# Altium PCB ArmBand-Control-Board.PcbDoc (part 3 of 3)
Units mm, origin at the board's own origin, x right, y up, seen from the top; angles counter-clockwise.
Board outline 45 x 45 mm, 2 copper layers (Top Layer, Bottom Layer), stack 0.864 mm thick; 111 components, 96 nets, 439 pads, 181 vias.
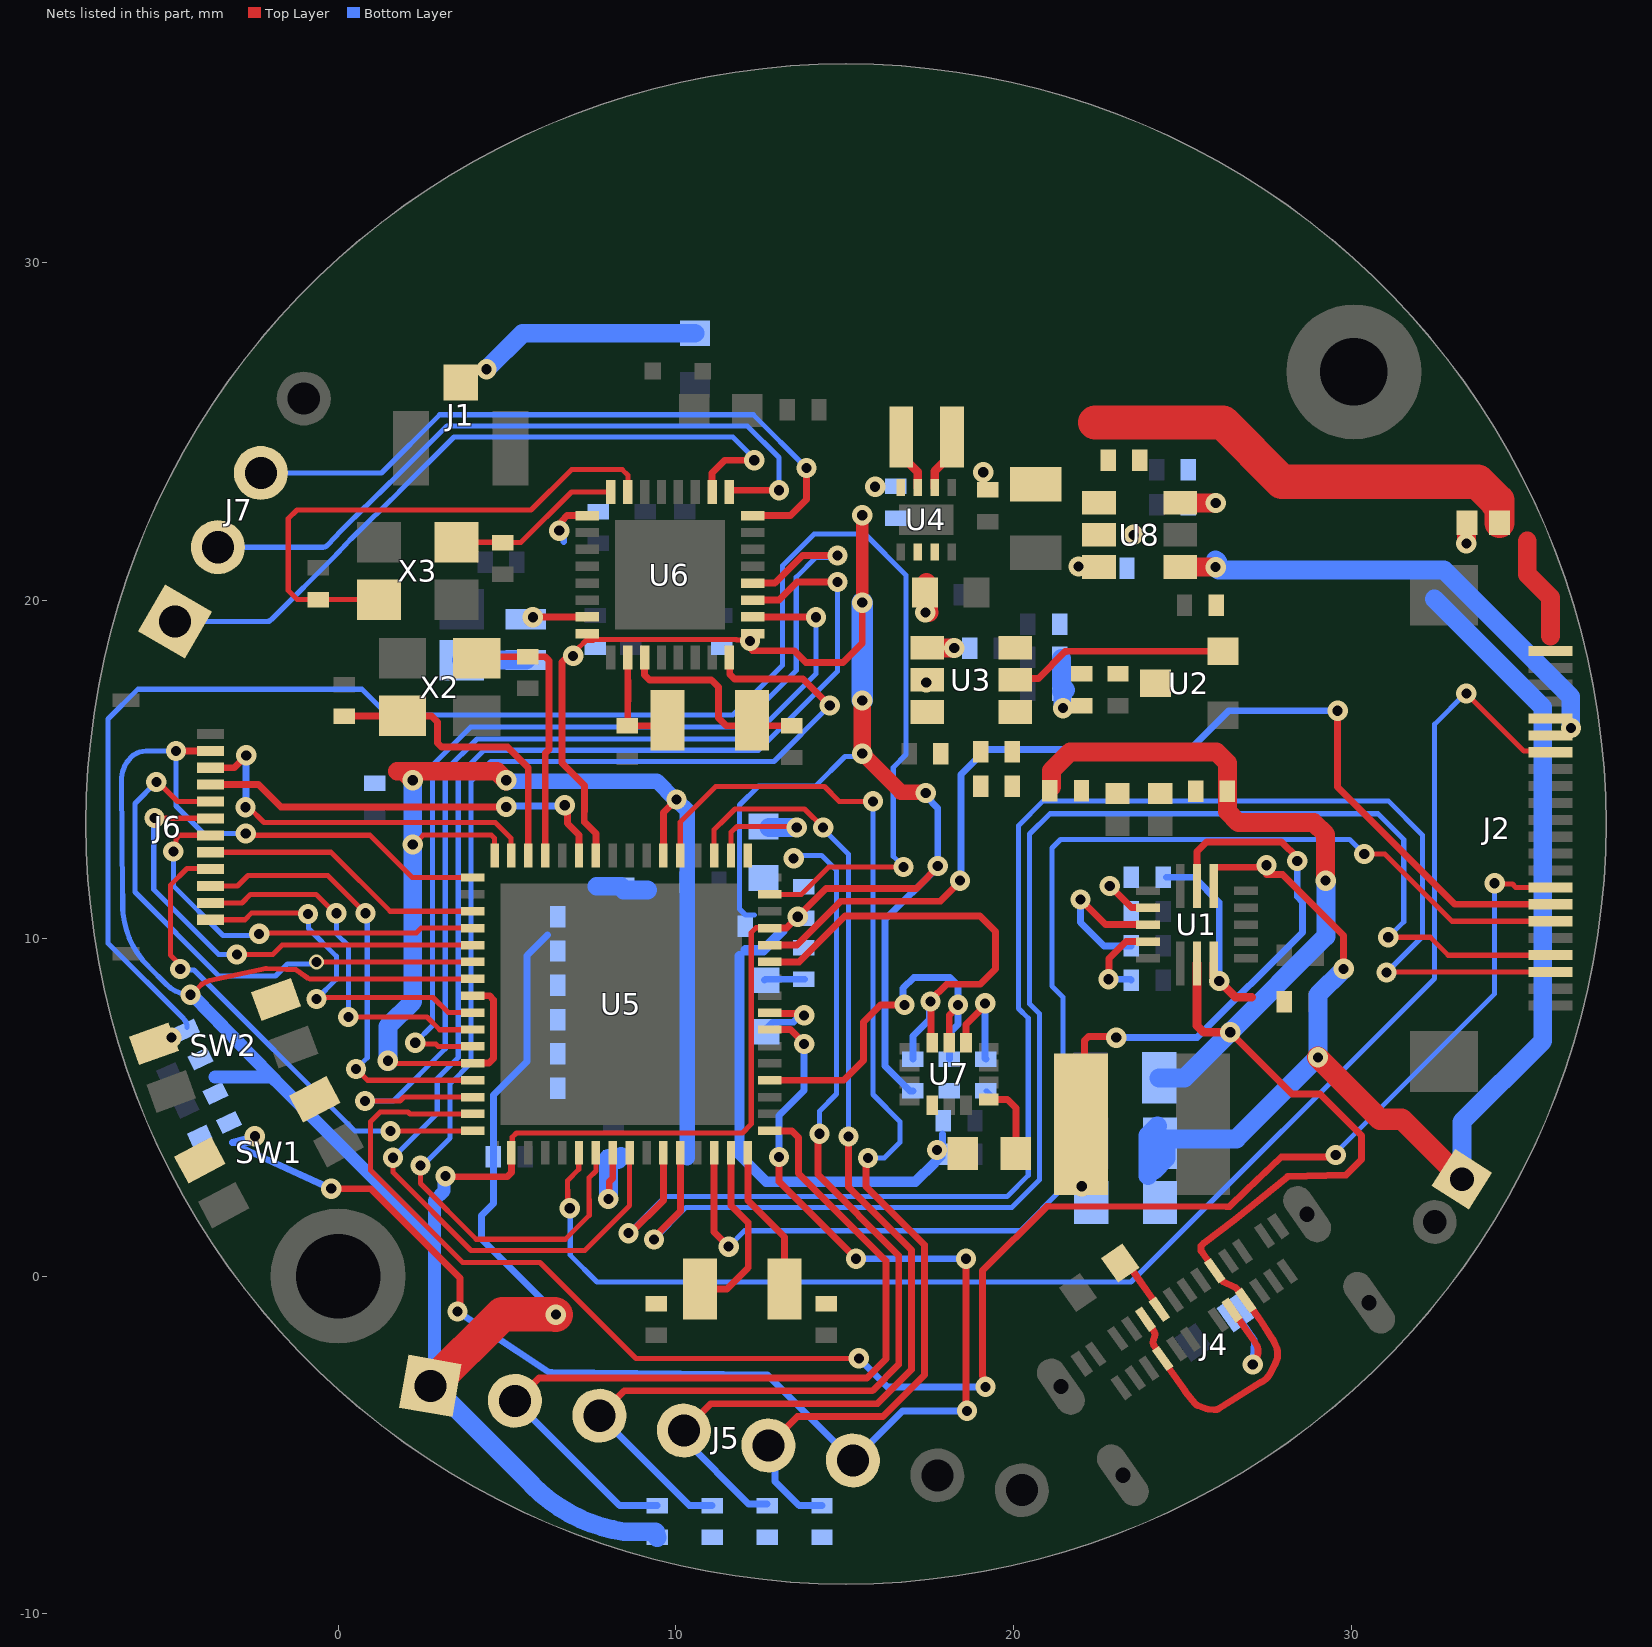
[diagram p2: the nets of this part, all layers, seen from the top]

## Via types
v1: diameter 0.6, hole 0.3, Top Layer to Bottom Layer, tented both sides, 178 vias
v2: diameter 0.45, hole 0.3, Top Layer to Bottom Layer, tented both sides, 2 vias
v3: diameter 0.6, hole 0.3, Top Layer to Bottom Layer, 1 vias

## Nets (pads, with @x,y where several pads share a name; then routed paths per layer and width w, separated by ;. In a path a pad name is that pad's centre, name@x,y a point inside that pad or via, vN(x,y) a via of type N, cw(c..) or ccw(c..) an arc to the next point about the centre after c; other vN are vias at no path point) (continued)
LCD_DB7: J2.7 U5.22 | length 44.9
  Top Layer w0.152: 6.797,2.544 6.797,2.835 7.126,3.164 7.126,3.646 U5.22@7.132,3.652 ; 6.798,2.544 6.798,2.074 v1(6.86,2.012) ; v1(33.401,17.247) 35.105,15.542 35.857,15.542 J2.7@35.89,15.509
  Bottom Layer w0.152: v1(6.86,2.012) 6.872,2 6.872,0.621 7.666,-0.173 23.474,-0.173 32.463,8.816 32.463,16.34 33.369,17.247 v1(33.401,17.247)
LCD_RD: J2.15 U5.15 | length 52.5
  Top Layer w0.152: U5.15@3.982,4.802 2.127,4.802 2.07,4.858 1.248,4.858 0.965,4.576 0.965,3.13 3.688,0.406 5.98,0.406 8.82,-2.434 v1(15.418,-2.434) ; v1(34.239,11.633) 34.266,11.607 34.768,11.607 34.866,11.509 J2.15@35.89,11.509
  Top Layer w0.203: v1(19.167,-3.277) 19.091,-3.201 19.091,-2.975 19.075,-2.959 19.075,0.163 20.982,2.07 21.067,2.07 26.304,2.056 26.389,2.056 26.873,2.54 27.921,3.531 29.476,3.531 v1(29.533,3.588)
  Bottom Layer w0.152: v1@29.533,3.656 34.239,8.362 v1(34.239,11.633)
  Bottom Layer w0.203: v1(15.418,-2.434) 16.261,-3.277 v1(19.167,-3.277) ; v1(29.533,3.588) v1@29.533,3.656
LCD_RS: J2.17 U5.30 | length 39.6
  Top Layer w0.152: v1(30.378,12.497) 30.988,12.497 32.976,10.509 J2.17@35.89,10.509
  Top Layer w0.203: U5.30@11.132,3.652 11.132,1.304 v1(11.563,0.873)
  Bottom Layer w0.152: v1(11.563,0.873) 12.036,1.346 20.193,1.346 21.463,2.616 21.463,8.255 21.133,8.585 21.133,12.675 21.387,12.929 29.947,12.929 v1(30.378,12.497)
LCD_RST: J2.20 U5.27 | length 47.9
  Top Layer w0.152: v1(31.039,8.992) 31.056,9.009 J2.20@35.89,9.009
  Top Layer w0.203: v1(8.595,1.273) 8.664,1.273 9.632,2.241 U5.27@9.632,3.617
  Bottom Layer w0.152: v1(8.595,1.273) 9.685,2.362 19.808,2.362 20.43,2.984 20.43,7.637 20.142,7.925 20.142,13.335 20.879,14.072 31.09,14.072 32.106,13.056 32.106,10.058 v1(31.039,8.992)
LCD_TE: J2.19 U5.28 | length 45.1
  Top Layer w0.152: v1(31.09,10.033) 32.334,10.033 32.868,9.5 35.881,9.5 J2.19@35.89,9.509
  Top Layer w0.203: v1(9.351,1.088) 9.351,1.147 10.132,1.928 U5.28@10.132,3.617
  Bottom Layer w0.152: v1(9.351,1.088) 10.295,2.032 19.945,2.032 20.76,2.848 20.76,7.774 20.472,8.062 20.472,13.086 21.077,13.691 30.785,13.691 31.547,12.929 31.547,10.49 v1(31.09,10.033)
LCD_WRT: J2.16 U5.44 | length 31.5
  Top Layer w0.203: U5.44@12.782,9.802 13.59,9.802 14.888,11.1 17.831,11.1 v1@18.44,11.709 ; v1(29.591,16.739) 29.591,14.478 33.06,11.009 J2.16@35.89,11.009
  Bottom Layer w0.203: v1@18.44,11.711 18.44,14.854 19.182,15.596 25.228,15.596 26.371,16.739 v1(29.591,16.739)
  other v1: 18.415,11.709
NetC16_2: C16.2 U1.14 | length 4.8
  Top Layer w0.203: v1(21.976,11.152) 22.722,10.406 U1.14@23.978,10.406
  Bottom Layer w0.203: v1(21.976,11.152) 21.976,10.477 22.674,9.779 C16.2@23.482,9.779
NetC22_2: C22.2 U1.15 | length 2.7
  Top Layer w0.203: v1(22.809,8.788) 22.824,8.804 22.824,9.408 23.172,9.756 23.323,9.906 U1.15@23.978,9.906
  Bottom Layer w0.203: v1(22.809,8.788) 23.457,8.788 C22.2@23.482,8.763
NetC44_1: C44.1 R27.2 U3.6
NetJ1_1: J1.1 SB3.2 | length 6.6
  Bottom Layer w0.559: v1(4.394,26.848) 5.461,27.915 SB3.2@10.566,27.915
NetJ4_A5: J4.A5 R20.2 | length 2
  Top Layer w0.203: R20.2@23.165,0.508 23.487,0.21 23.49,0.207 23.506,0.192 24.208,-0.811 J4.A5@24.365,-1.035
NetJ4_B5: J4.B5 R21.2 | length 3.8
  Top Layer w0.203: J4.B5@26.515,-1.055 26.672,-1.279 27.108,-1.902 27.201,-2.061 cw(c27.026,-2.163) 27.229,-2.163 27.229,-2.281 cw(c27.026,-2.281) 27.199,-2.386 27.102,-2.548 27.065,-2.609 27,-2.718 v1(27.076,-2.616)
  Bottom Layer w0.203: R21.2@26.568,-1.092 26.765,-1.373 27.124,-1.885 27.124,-1.956 27.123,-1.964 v1(27.076,-2.616)
NetL1_1: L1.1 U4.7 | length 2.2
  Top Layer w0.254: L1.1@16.612,25.349 16.702,25.258 16.702,24.268 17.162,23.808 U4.7@17.162,23.343
NetL3_1: L3.1 L4.2 | length 1.9
  Bottom Layer w0.559: L3.1@3.658,18.237 3.661,18.24 5.559,18.24 L4.2@5.563,18.244
NetL4_1: L4.1 U6.31 | length 1.6
  Top Layer w0.203: v1@5.766,19.516 U6.31@7.374,19.516
  other v1: 5.766,19.507
NetL6_2: L6.2 U7.8 | length 2.3
  Top Layer w0.203: U7.8@19.266,5.232 19.812,5.232 20.066,4.978 L6.2@20.066,3.632
NetLED1_2: LED1.2 R28.2 | length 1.3
  Top Layer w0.559: v1(33.401,21.692) 33.409,21.699 33.409,22.284 LED1.2@33.426,22.301
  Bottom Layer w0.203: R28.2@33.426,22.276 R28.2@33.452,22.301
  Bottom Layer w0.254: v1(33.401,21.692) 33.426,21.717 R28.2@33.426,22.276
NetLED2_1: LED2.1 R2.1
NetLED3_1: LED3.1 R3.1
NetR5_2: R5.2 SB1.2 | length 1.2
  Bottom Layer w0.203: SB1.2@12.624,8.763 12.649,8.788 R5.2@13.818,8.788
NetR6_2: R6.2 SB2.2
NetR9_1: R9.1 U3.1 | length 0.8
  Top Layer w0.559: U3.1@17.455,18.593 v1(18.242,18.593)
NetR12_2: R12.2 U7.12 | length 3.1
  Top Layer w0.203: U7.12@18.591,6.907 18.591,7.453 19.156,8.018 v1(19.156,8.077)
  Bottom Layer w0.203: v1(19.156,8.077) 19.156,6.447 R12.2@19.177,6.426
NetR22_2: R22.2 U8.1
NetR23_2: R23.2 U8.3 | length 0
  Top Layer w0.559: U8.3@22.497,20.963 U8.3@22.53,20.996
  other v1: 21.92,21.006
NetR26_1: R26.1 U4.8
  other v1: 15.9,23.368
NetSB1_1: SB1.1 U5.40 | length 2.3
  Top Layer w0.203: U5.40@12.817,7.802 12.84,7.778 13.74,7.778 v1(13.797,7.722)
  Bottom Layer w0.203: SB1.1@12.686,7.301 12.686,7.327 12.878,7.518 13.486,7.518 13.69,7.722 v1(13.797,7.722)
NetSB2_1: SB2.1 U5.50 | length 3.5
  Top Layer w0.152: U5.50@11.632,12.452 11.632,13.14 11.807,13.314 13.542,13.314 v1(13.577,13.279)
  Bottom Layer w0.559: SB2.1@12.754,13.287 13.569,13.287 v1(13.577,13.279)
NRST: C24.1 J5.6 R8.1 SW1.1 U5.39 | length 44.1
  Top Layer w0.203: v1(-0.203,2.591) 0.981,2.575 3.614,-0.058 3.614,-0.973 v1(3.538,-1.049) ; U5.39@12.782,7.302 13.397,7.302 13.797,6.902 v1(13.797,6.875) ; v1(13.056,3.526) 13.056,2.796 v1(15.336,0.516) ; v1@18.588,0.543 v1(18.588,0.516) 18.588,-3.958 v1(18.618,-3.988)
  Bottom Layer w0.203: -2.87,3.808 -2.296,3.545 v1(-0.203,2.591) ; v1@-2.464,3.961 -3.132,3.961 v1(-2.464,4.14) ; v1(3.538,-1.049) 6.241,-2.845 6.323,-2.845 12.709,-2.924 12.768,-2.983 J5.6@15.239,-5.454 16.705,-3.988 v1(18.618,-3.988) ; v1(13.056,3.526) 13.056,4.75 13.797,5.491 v1(13.797,6.875) ; v1(15.336,0.516) v1(18.588,0.516)
NTC: R18.1 R19.1 U1.13 | length 1.4
  Top Layer w0.203: v1(22.845,11.55) 23.483,10.912 23.972,10.912 U1.13@23.978,10.906
PWR_RST: R4.2 U2.2 U3.5 | length 6.5
  Top Layer w0.203: U3.5@20.045,17.653 20.089,17.697 20.731,17.697 21.525,18.491 21.565,18.491 21.575,18.501 U2.2@26.197,18.501
RS1: L8.2 R1.2 U1.10 | length 18.7
  Top Layer w0.203: L8.2@22.101,4.496 22.101,6.973 22.22,7.092 23.007,7.092 v1(23.038,7.061) ; U1.10@25.428,11.556 25.428,12.575 25.705,12.852 27.932,12.852 28.397,12.387 v1(28.397,12.294)
  Top Layer w0.559: L8.2@22,4.496 22,2.679 v1(22.017,2.662)
  Bottom Layer w0.203: v1(23.038,7.061) 25.435,7.061 28.55,10.176 28.55,11.083 28.397,11.235 v1(28.397,12.294)
RST_NRF: J7.3 U6.16 | length 20.2
  Top Layer w0.203: U6.16@12.275,22.516 13.397,22.516 13.868,22.987 v1(13.868,23.927)
  Bottom Layer w0.152: J7.3@-2.286,23.78 1.29,23.78 3.012,25.502 12.294,25.502 v1(13.868,23.927)
SCL: R10.1 U5.36 U7.13 | length 11.4
  Top Layer w0.203: U5.36@12.817,5.802 14.971,5.802 15.555,6.386 15.555,7.529 16.058,8.032 v1(16.77,8.032) ; U7.13@18.091,6.907 18.091,7.714 18.35,7.973 v1(18.35,8.032)
  Bottom Layer w0.203: v1(16.77,8.032) 16.729,8.073 16.729,8.525 17.043,8.839 18.11,8.839 18.35,8.599 v1(18.35,8.032) ; R10.1@18.098,6.426 18.101,6.429 18.101,7.196 18.352,7.447 v1@18.352,8.03
SDA: R11.1 U5.43 U7.14 | length 14.1
  Top Layer w0.203: U5.43@12.817,9.302 13.652,9.302 15.009,10.659 19.008,10.659 19.458,10.209 19.458,9.089 19.011,8.641 18.013,8.641 17.541,8.168 v1(17.541,8.133) ; v1@17.506,8.129 17.548,8.086 U7.14@17.548,6.795
  Bottom Layer w0.203: R11.1@17.018,6.426 17.018,7.112 17.506,7.6 17.506,8.098 v1(17.541,8.133)
SENSOR1: J6.1 U5.9 | length 10.9
  Top Layer w0.152: J6.1@-3.774,10.551 -2.759,10.551 -2.553,10.756 -0.926,10.756 v1(-0.889,10.719) ; v1@-0.589,8.25 2.813,8.25 3.262,7.802 U5.9@3.947,7.802
  Top Layer w0.203: v1(-0.635,8.204) v1@-0.589,8.25
  Bottom Layer w0.152: v1(-0.889,10.719) -0.872,10.702 -0.872,10.293 -0.051,9.471 -0.051,8.788 v1(-0.635,8.204)
SENSOR2: J6.2 U5.10 | length 11.1
  Top Layer w0.152: J6.2@-3.774,11.051 -2.843,11.051 -2.591,11.303 -0.652,11.303 -0.093,10.744 v1(-0.051,10.744) ; v1@0.356,7.671 2.634,7.671 3.011,7.294 U5.10@3.974,7.294
  Bottom Layer w0.152: v1(-0.051,10.744) -0.051,10.139 0.305,9.784 v1(0.305,7.671)
SENSOR3: J6.3 U5.13 | length 13.4
  Top Layer w0.152: J6.3@-3.774,11.551 -2.981,11.551 -2.67,11.862 -0.305,11.862 v1(0.813,10.744) ; v1(0.533,6.136) 0.868,5.802 U5.13@3.982,5.802
  Bottom Layer w0.152: v1(0.533,6.136) 0.864,6.466 v1@0.864,10.662
SENSOR4: J6.4 U5.16 | length 14.8
  Top Layer w0.152: v1(-4.674,9.093) -4.674,9.214 -4.965,9.506 -4.965,11.57 -4.47,12.065 -3.788,12.065 J6.4@-3.774,12.051 ; v1(1.549,4.293) 1.554,4.297 4.123,4.297 U5.16@4.128,4.293
  Bottom Layer w0.152: v1(-4.674,9.093) -4.643,9.062 -4.262,9.062 0.508,4.293 v1(1.549,4.293)
SENSOR5: J6.5 U5.3 | length 8.5
  Top Layer w0.152: J6.5@-3.774,12.551 -0.206,12.551 1.543,10.802 U5.3@3.982,10.802
SENSOR6: J6.6 U5.4 | length 12
  Top Layer w0.152: v1(-4.877,12.573) -4.801,12.649 -4.801,12.941 -4.691,13.051 J6.6@-3.774,13.051 ; v1(-2.337,10.135) -2.311,10.16 2.315,10.16 2.457,10.302 U5.4@3.982,10.302
  Bottom Layer w0.152: v1(-4.877,12.573) -4.877,11.557 -3.404,10.084 -2.388,10.084 v1(-2.337,10.135)
SENSOR7: J6.7 U5.5 | length 14.1
  Top Layer w0.152: v1(-5.436,13.564) -5.429,13.557 -3.78,13.557 J6.7@-3.774,13.551 ; v1@-2.972,9.525 -1.93,9.525 -1.654,9.802 U5.5@3.982,9.802
  Bottom Layer w0.152: v1@-5.456,13.543 -5.456,11.451 -3.531,9.525 v1(-2.997,9.525)
  Bottom Layer w0.203: v1@-5.456,13.543 v1(-5.436,13.564)
SENSOR8: J6.8 U5.6 | length 16.5
  Top Layer w0.152: v1(-5.38,14.63) -5.334,14.63 -4.754,14.051 J6.8@-3.774,14.051 ; v2@-0.63,9.302 U5.6@3.982,9.302
  Bottom Layer w0.152: v1(-5.38,14.63) -6.015,13.995 -6.015,11.374 -3.531,8.89 -1.854,8.89 -1.499,9.246 -0.66,9.246 v2@-0.635,9.22
  other v2: -0.635,9.296
SW1: J6.9 U5.59 | length 12.4
  Top Layer w0.203: J6.9@-3.774,14.551 -2.352,14.551 -1.695,13.894 v1(4.978,13.894) ; v1(6.711,13.94) 6.787,13.864 6.787,13.408 7.132,13.063 U5.59@7.132,12.452
  Bottom Layer w0.203: v1(4.978,13.894) 5.001,13.917 6.689,13.917 v1(6.711,13.94)
SW2: J6.10 U5.63 | length 11.5
  Top Layer w0.152: v1@-2.645,13.882 -2.195,13.432 4.653,13.432 5.12,12.965 U5.63@5.12,12.464
  Top Layer w0.203: J6.10@-3.774,15.051 -3.085,15.051 v1(-2.718,15.418) ; v1(-2.743,13.882) v1@-2.645,13.882 ; U5.63@5.12,12.464 U5.63@5.132,12.452
  Bottom Layer w0.203: v1(-2.743,13.882) -2.731,13.895 -2.731,15.405 v1(-2.718,15.418)
SWDCLK: J7.2 U6.17 | length 20.9
  Top Layer w0.203: U6.17@11.575,23.216 11.575,23.228 11.613,23.266 v1(13.056,23.266)
  Bottom Layer w0.152: J7.2@-3.556,21.58 -0.455,21.58 ccw(c-0.455,21.783) -0.311,21.64 ccw(c-0.455,21.783) -0.306,21.645 0.083,22.065 cw(c0.787,21.412) 0.115,22.098 1.555,23.506 ; 1.559,23.51 3.22,25.171 12.116,25.171 13.056,24.232 v1(13.056,23.266)
SWDIO: J7.1 U6.18 | length 21.6
  Top Layer w0.203: U6.18@11.074,23.216 11.074,23.779 11.451,24.155 v1(12.319,24.155)
  Bottom Layer w0.152: J7.1@-4.826,19.38 -2.116,19.38 ccw(c-2.116,19.583) -1.973,19.439 -0.042,21.37 ; -0.027,21.386 0.362,21.805 ; 0.383,21.827 1.823,23.235 ; 1.828,23.24 3.429,24.841 11.684,24.841 12.319,24.206 v1(12.319,24.155)
TCK: J5.5 R16.1 U5.53 | length 34.4
  Top Layer w0.152: U5.53@10.131,12.453 10.131,13.446 11.178,14.494 14.397,14.494 14.834,14.057 v1(15.835,14.057)
  Top Layer w0.203: J5.5@12.738,-5.013 13.595,-4.156 16.131,-4.156 17.359,-2.928 17.359,0.928 15.632,2.655 15.632,3.437 v1(15.69,3.495)
  Bottom Layer w0.152: v1(15.69,3.495) 16.169,3.495 16.637,3.962 16.637,4.572 15.835,5.374 v1(15.835,14.057)
  Bottom Layer w0.203: J5.5@12.738,-5.013 12.933,-5.209 12.933,-6.075 13.652,-6.794 R16.1@14.326,-6.794
TDI: J5.2 R13.1 U5.33 | length 25.6
  Top Layer w0.203: J5.2@5.233,-3.69 5.274,-3.69 5.951,-3.013 15.658,-3.013 16.216,-2.454 16.216,0.455 13.635,3.036 13.635,4.104 13.437,4.302 U5.33@12.782,4.302
  Bottom Layer w0.203: J5.2@5.233,-3.69 8.338,-6.794 R13.1@9.449,-6.794
TDO: J5.3 R14.1 U5.49 | length 31.1
  Top Layer w0.203: J5.3@7.735,-4.131 8.472,-3.394 15.816,-3.394 16.597,-2.612 16.597,0.613 14.205,3.005 14.205,4.172 v1(14.249,4.216)
  Bottom Layer w0.152: v1@13.573,12.455 14.316,12.455 14.757,12.014 14.757,5.389 14.249,4.881 v1(14.249,4.216)
  Bottom Layer w0.203: J5.3@7.735,-4.131 10.398,-6.794 R14.1@11.074,-6.794
  other v1: 13.487,12.37
TMS: J5.4 R15.1 U5.51 | length 32.6
  Top Layer w0.152: U5.51@11.132,12.452 11.132,13.215 11.481,13.564 11.751,13.833 13.807,13.833 v1(14.361,13.279)
  Top Layer w0.203: J5.4@10.236,-4.572 11.033,-3.775 15.973,-3.775 16.978,-2.77 16.978,0.77 15.111,2.638 v1(15.111,4.135)
  Bottom Layer w0.152: v1(14.361,13.279) 14.361,13.24 15.111,12.49 v1(15.111,4.135)
  Bottom Layer w0.203: J5.4@10.236,-4.572 10.236,-4.826 12.154,-6.744 R15.1@12.7,-6.744
UART_CTS: U5.25 U6.11 | length 40.5
  Top Layer w0.152: v1(1.626,3.505) 1.631,3.5 1.631,3.068 3.937,0.762 7.301,0.762 8.632,2.093 U5.25@8.632,3.652
  Top Layer w0.203: U6.11@12.275,20.015 13.056,20.015 13.589,20.549 v1(14.783,20.549)
  Bottom Layer w0.152: v1(1.626,3.505) 2.938,4.817 2.938,5.855 3.556,6.473 3.556,14.809 4.318,15.57 12.446,15.57 14.783,17.907 v1(14.783,20.549)
UART_RTS: U5.23 U6.8 | length 35.9
  Top Layer w0.152: v1(2.438,3.277) 2.438,2.743 4.089,1.092 6.727,1.092 7.437,1.803 7.437,2.261 7.433,2.266 7.433,2.911 7.632,3.111 U5.23@7.632,3.652
  Top Layer w0.203: U6.8@11.575,18.315 11.593,18.296 11.593,17.82 11.735,17.678 13.767,17.678 v1(14.554,16.891)
  Bottom Layer w0.152: v1@2.505,3.277 3.319,4.09 3.319,5.697 3.937,6.315 3.937,14.651 4.526,15.24 12.903,15.24 v1(14.554,16.891)
  Bottom Layer w0.203: v1(2.438,3.277) v1@2.505,3.277
UART_RXD: U5.11 U6.12 | length 29.2
  Top Layer w0.152: v1(2.286,6.909) 2.32,6.875 2.891,6.875 2.964,6.802 U5.11@3.947,6.802
  Top Layer w0.203: U6.12@12.275,20.516 12.929,20.516 13.75,21.336 v1(14.783,21.336)
  Bottom Layer w0.152: v1(2.286,6.909) 2.794,7.417 2.794,15.124 3.926,16.256 11.887,16.256 13.564,17.932 13.564,20.691 14.153,21.28 14.727,21.28 v1(14.783,21.336)
UART_TXD: U5.14 U6.10 | length 30.2
  Top Layer w0.152: v1(0.794,5.189) 1.836,5.189 1.949,5.302 U5.14@3.982,5.302
  Top Layer w0.203: U6.10@12.301,19.516 12.305,19.511 14.144,19.511 v1(14.148,19.507)
  Bottom Layer w0.152: v1(0.794,5.189) 1.633,5.189 3.175,6.731 3.175,14.966 4.109,15.9 12.217,15.9 14.148,17.831 v1(14.148,19.507)
VBAT: C2.1 C3.1 C4.1 C43.1 C44.2 J3.1 R1.1 R24.2 R27.1 U1.9 U3.4 | length 44.3
  Top Layer w0.203: U1.9@25.928,11.556 25.928,12.081 25.951,12.104 27.421,12.104 v1(27.483,12.167) ; v1@27.483,12.09 27.483,11.887 27.965,11.887 29.769,10.084 v1(29.769,9.098)
  Top Layer w0.559: U3.4@20.045,16.703 U3.4@20.116,16.632
  Top Layer w0.635: v1(29.007,6.477) 30.839,4.645 31.494,4.645 J3.1@33.271,2.868
  Bottom Layer w0.559: C43.1@21.412,17.31 21.455,17.267 21.455,16.823 v1(21.463,16.815) ; C4.1@21.412,18.288 21.412,17.483 C43.1@21.539,17.356 ; 23.978,2.972 23.978,4.166 C2.1@24.257,4.445 ; 24.143,3.124 24.517,3.499 24.517,4.02 24.562,4.064 26.594,4.064 v1(29.007,6.477) 29.007,8.324 v1@29.769,9.086 ; 32.452,20.051 35.662,16.841 35.662,6.96 33.271,4.569 J3.1@33.271,2.868
VBAT#: C5.1 C6.1 C51.1 U3.2 U3.3 U4.2 U4.3 | length 0.9
  Top Layer w0.559: C5.1@17.399,20.117 C5.1@17.424,20.117 ; C5.1@17.424,20.536 C5.1@17.424,20.117 ; v1@17.488,19.645 17.48,19.653 17.48,20.073 17.437,20.117 C5.1@17.424,20.117
  other v1: 17.412,17.577 17.387,19.645
VBAT##: R24.1 R25.1 U2.3
VCC: C45.1 R18.2 U1.3 | length 6
  Top Layer w0.254: U1.3@25.928,9.256 25.928,8.867 25.93,8.865 25.959,8.865 26.568,8.255 27.051,8.255
  Bottom Layer w0.203: R18.2@24.524,11.811 25.344,11.811 26.086,11.069 v1(26.086,8.738)
VCC_2V8: C48.1 C49.1 J2.5 J2.6 U8.4 U8.6 | length 15.4
  Top Layer w0.559: U8.4@24.93,20.996 v1@25.974,20.996 ; U8.6@24.93,22.896 24.935,22.891 v1@25.979,22.891
  Bottom Layer w0.559: v1@26.055,21.128 25.979,21.204 v1(25.979,20.99) 26.065,20.904 32.741,20.904 36.492,17.153 36.492,16.238 v1(36.5,16.231)
  other v1: 25.984,22.885
VCC_3V3: C7.1 C9.1 C10.1 C11.1 C12.1 C13.1 C14.1 C31.1 C33.1 C34.1 C41.1 C42.1 C46.1 C47.1 J2.1 J5.1 J6.11 L1.2 L6.1 LED1.1 R5.1 R6.1 R7.2 R8.2 R10.2 R11.2 R12.1 R13.2 R14.2 R15.2 R16.2 R22.1 R23.1 R26.2 U4.6 U5.1 U5.7 U5.18 U5.45 U5.58 U6.9 U6.25 U6.32 U7.5 U8.2 | length 177.9
  Top Layer w0.152: v1(-4.369,8.331) -4.343,8.331 -4.033,8.641 -3.894,8.712 -3.805,8.75 -2.142,9.109 -2.122,9.109 -2.119,9.109 -1.245,9.07 -0.912,8.831 -0.823,8.802 U5.7@3.982,8.802 ; v1@-2.68,13.051 0.945,13.051 2.194,11.802 U5.1@3.982,11.802 ; U5.18@5.132,3.652 5.156,3.676 5.156,4.115 5.281,4.239 11.971,4.239 12.233,4.501 12.233,10.175 12.37,10.312 12.786,10.312 U5.45@12.789,10.309 ; 7.137,18.618 7.337,18.818 7.547,18.818 7.572,18.843 11.788,18.843 11.799,18.833 v1@12.166,18.833 ; U6.32@7.374,19.015 7.547,18.843 ; U6.9@12.038,18.961 v1@12.166,18.833 ; v1(12.192,18.807) v1@12.166,18.833
  Top Layer w0.203: v1(-4.801,15.545) -4.798,15.548 -3.777,15.548 J6.11@-3.774,15.551 ; v1(-2.734,13.105) v1@-2.68,13.051 ; v1(3.178,2.962) 3.198,2.942 5.006,2.942 5.132,3.068 U5.18@5.132,3.652 ; v1(6.547,22.07) 6.623,22.146 6.623,22.356 6.782,22.516 U6.25@7.374,22.516 ; v1(6.96,18.364) 6.807,18.364 6.629,18.186 6.629,15.189 7.291,14.528 7.291,13.959 7.291,13.76 7.289,13.758 7.289,13.445 7.632,13.102 U5.58@7.632,12.452 ; 12.268,18.517 13.501,18.517 13.847,18.171 14.945,18.171 15.519,18.745 v1(15.519,19.939) ; U5.45@12.789,10.309 13.275,10.309 13.605,10.639 v1(13.608,10.639) 14.45,11.481 17.12,11.481 v1@17.856,12.217
  Top Layer w0.254: U4.6@17.662,23.343 17.662,23.835 18.096,24.268 18.096,25.359 L1.2@18.11,25.373
  Top Layer w0.381: v1(15.519,19.939) v1(15.519,22.525)
  Top Layer w0.457: v1(15.519,15.469) 16.66,14.328 17.346,14.328 v1@17.374,14.3
  Top Layer w0.508: v1(15.519,15.469) v1(15.519,17.043)
  Top Layer w0.559: 35.204,21.768 35.204,20.777 35.89,20.091 35.89,18.948
  Top Layer w0.889: LED1.1@34.376,22.301 34.376,22.972
  Top Layer w1.016: J5.1@2.732,-3.249 4.856,-1.124 6.417,-1.124 6.432,-1.139 v1(6.448,-1.139) ; 22.415,25.273 26.187,25.273 27.94,23.52 33.739,23.52 34.315,22.944 34.315,22.911
  Bottom Layer w0.152: -6.38,11.303 -6.411,14.592 cw(c-5.444,14.675) -6.132,15.36 cw(c-5.687,14.917) -5.687,15.545 v1@-4.826,15.545 ; -6.375,11.303 -6.375,10.984 ccw(c-3.835,10.984) -6.363,10.73 ccw(c-3.835,10.984) -5.631,9.187 -5.063,8.619 ccw(c-4.369,9.312) v1(-4.369,8.331) ; v1@-4.775,15.545 cw(c-5.082,15.851) -4.801,15.521 -4.801,13.919 -3.986,13.105 v1(-2.734,13.105) ; -1.954,5.893 -1.921,5.859 -1.88,5.817 ; 12.319,10.693 12.065,10.693 11.887,10.871 11.887,13.945 12.446,14.503 14.128,14.503 15.008,15.383 15.459,15.383 v1@15.545,15.469 ; 17.662,3.363 17.751,3.363 17.904,3.515 C42.1@17.904,3.604 ; R12.1@19.177,5.486 19.202,5.486 R12.1@19.406,5.283
  Bottom Layer w0.203: 6.198,10.096 5.588,9.487 5.588,6.35 4.597,5.359 C11.1@4.597,3.531 4.597,2.156 4.242,1.801 4.242,1.096 6.448,-1.11 v1(6.448,-1.139) ; 6.68,21.742 v1@6.68,21.931 ; R11.2@17.018,5.486 16.929,5.486 16.19,6.225 16.19,10.552 17.755,12.116 v1(17.755,12.141) 17.755,13.852 17.399,14.207 v1(17.399,14.3) ; v1(17.729,3.734) 17.894,3.899 17.894,4.204
  Bottom Layer w0.305: 11.887,9.473 11.887,3.582 12.675,2.794 17.093,2.794 17.662,3.363 ; 12.065,9.652 12.586,9.652 13.157,10.223
  Bottom Layer w0.381: v1(-4.369,8.331) -4.327,8.331 -4.242,8.246 cw(c-4.514,7.979) -4.241,8.244 -1.98,5.919 -1.921,5.859 -1.879,5.816 ; -3.645,5.893 -2.007,5.893 ; -1.852,5.789 2.853,1.084 ; J5.1@2.732,-3.249 2.853,-3.128 2.853,1.084 ; v1@3.178,2.898 3.141,2.86 3.141,2.528 2.853,2.24 2.853,1.084
  Bottom Layer w0.559: J5.1@2.732,-3.249 2.811,-3.249 5.759,-6.196 ccw(c9.177,-2.798) 8.474,-7.567 9.332,-7.567 9.398,-7.567 9.43,-7.698 R13.2@9.449,-7.734 ; 7.658,11.544 8.369,11.544 8.458,11.455 8.458,11.43 9.156,11.43
  Bottom Layer w0.635: v1(15.519,17.043) v1(15.519,19.939)
  other v1: 23.546,21.946 19.101,23.8
VDD_1V2: C15.1 C17.1 C18.1 C19.1 C20.1 C21.1 U5.8 U5.12 U5.24 U5.54 U5.64 | length 41.5
  Top Layer w0.152: v1@1.473,6.299 1.475,6.301 3.981,6.301 U5.12@3.982,6.302 ; v1(2.21,12.776) 2.243,12.776 2.523,13.056 4.543,13.056 4.632,12.966 U5.64@4.632,12.452
  Top Layer w0.203: U5.12@3.982,6.302 3.991,6.311 4.473,6.311 4.604,6.441 4.604,8.183 4.485,8.302 U5.8@4.237,8.302 ; v1(8.001,2.286) 8.026,2.311 8.026,2.794 8.132,2.9 U5.24@8.132,3.652 ; U5.54@9.632,12.452 9.632,13.731 v1(10.016,14.114)
  Top Layer w0.559: 1.753,14.948 1.943,14.948 ; v1(2.21,14.681) 1.943,14.948 ; v1@4.978,14.662 4.978,14.67 4.701,14.948 1.943,14.948
  Bottom Layer w0.457: v1@4.978,14.656 9.436,14.656 9.977,14.114 v1@10.004,14.114 ; v1@10.083,14.036 10.338,13.781 C21.1@10.338,11.659 10.338,3.505
  Bottom Layer w0.559: v1@1.473,6.35 v1(1.473,6.375) 1.473,7.391 2.21,8.128 v1(2.21,12.776) v1(2.21,14.681) ; v1(8.001,2.286) 8.001,3.48 C20.1@8.29,3.48 ; C20.1@8.29,3.458 C20.1@8.375,3.543 ; v1@10.004,14.114 v1(10.016,14.114)
  other v1: 4.978,14.681
VUSB: C1.1 J4.A4 J4.A9 J4.B4 J4.B9 R2.2 R3.2 U1.2 | length 45.1
  Top Layer w0.203: J4.A4@23.904,-1.271 24.061,-1.495 24.145,-1.614 cw(c23.978,-1.731) 24.169,-1.802 24.14,-1.879 ccw(c24.33,-1.951) 24.163,-2.067 24.264,-2.211 J4.B9@24.416,-2.438 24.563,-2.669 25.091,-3.424 ; 25.092,-3.425 ccw(c25.258,-3.307) 25.1,-3.435 25.366,-3.767 ; 25.366,-3.768 ccw(c25.524,-3.64) 25.451,-3.83 25.702,-3.926 25.759,-3.94 25.941,-3.956 ; 25.942,-3.956 ccw(c25.96,-3.754) 26.068,-3.926 27.299,-3.154 cw(c27.407,-3.326) 27.32,-3.142 27.322,-3.141 ccw(c27.076,-2.616) 27.406,-3.092 ccw(c27.076,-2.616) 27.587,-2.89 27.737,-2.611 ccw(c27.558,-2.515) 27.748,-2.586 27.8,-2.448 ccw(c27.61,-2.376) 27.813,-2.376 27.813,-2.23 27.794,-2.143 27.667,-1.868 ccw(c27.482,-1.953) 27.653,-1.843 ; v1(26.413,7.22) 28.236,5.396 29.072,5.396 30.302,4.166 30.302,3.454 29.905,3.057 29.845,2.997 28.109,2.949 26.547,1.675 25.622,0.973 ccw(c25.752,0.816) 25.621,0.971 25.615,0.966 25.549,0.9 25.549,0.752 25.586,0.7 25.802,0.391 J4.A9@25.952,0.163 26.117,-0.055 26.189,-0.159 26.563,-0.339 26.581,-0.351 26.617,-0.386 26.7,-0.505 J4.B4@26.874,-0.718 27.042,-0.934 27.33,-1.346 27.653,-1.842
  Top Layer w0.254: U1.2@25.428,9.256 25.428,7.415 25.623,7.22 v1(26.413,7.22)
  Top Layer w0.559: R3.2@21.12,14.478 21.12,14.963 21.676,15.519 26,15.519 26.327,15.192 R2.2@26.327,14.351 26.327,13.757 26.654,13.43 28.883,13.43 29.235,13.077 v1(29.235,11.709)
  Bottom Layer w0.559: C1.1@24.308,5.867 25.061,5.867 26.399,7.206 v1@26.399,7.214 ; v1@26.405,7.22 29.246,10.06 29.246,10.523 29.243,10.526 29.243,11.702 v1(29.235,11.709)
WKUP: C23.1 R7.1 SW2.1 U5.47 | length 52
  Top Layer w0.152: U5.47@12.782,11.302 13.715,11.302 14.529,12.116 v1(16.739,12.116)
  Bottom Layer w0.152: R7.1@-4.47,7.366 ccw(c-4.838,7.366) -4.578,7.626 -6.807,9.855 -6.807,16.493 -5.927,17.374 0.711,17.374 1.473,16.612 11.684,16.612 13.157,18.085 13.157,21.031 14.097,21.971 15.596,21.971 16.815,20.752 16.815,15.443 16.434,15.062 16.434,12.429 16.739,12.124 v1(16.739,12.116)
  other v1: -4.928,7.061
X32_NRF: C8.2 U6.2 X4.1 | length 3.1
  Top Layer w0.203: C8.2@8.56,16.294 C8.2@8.575,16.294 ; U6.2@8.575,18.315 8.575,17.645 8.58,17.639 8.58,17.033 8.575,17.027 C8.2@8.575,16.294 ; X4.1@9.588,16.294 C8.2@8.575,16.294
XC_IN: C39.2 U6.23 X3.1 | length 16.1
  Top Layer w0.152: X3.1@1.212,20.029 C39.2@-0.584,20.029 -1.207,20.029 -1.473,20.295 -1.473,22.428 -1.219,22.682 5.715,22.682 6.909,23.876 8.413,23.876 8.58,23.708 U6.23@8.58,23.221
  Top Layer w0.203: U6.23@8.575,23.216 U6.23@8.58,23.221
XC_OUT: C40.2 U6.24 X3.3 | length 5.2
  Top Layer w0.152: X3.3@3.512,21.729 C40.2@4.877,21.729 ; C40.2@4.877,21.717 5.41,21.717 6.909,23.216 U6.24@8.074,23.216
XIN: C27.2 U5.62 X2.1 | length 8.9
  Top Layer w0.203: C27.2@0.305,16.586 1.905,16.586 2.769,16.586 2.946,16.408 2.946,15.78 3.065,15.661 5.022,15.661 5.632,15.05 U5.62@5.632,12.452
XIN32: C25.2 U5.32 X1.1 | length 4.7
  Top Layer w0.203: U5.32@12.132,3.861 12.132,2.244 13.213,1.163 X1.1@13.213,-0.381
XO32_NRF: C50.2 U6.3 X4.2 | length 5.9
  Top Layer w0.203: U6.3@9.074,18.315 9.074,17.801 9.222,17.653 11.049,17.653 11.263,17.439 11.263,16.525 11.493,16.294 12.089,16.294 X4.2@12.254,16.459 ; X4.2@12.419,16.294 C50.2@13.437,16.294
XOUT: C28.2 U5.61 X2.3 | length 8.1
  Top Layer w0.203: X2.3@4.061,18.332 4.067,18.339 C28.2@5.702,18.339 ; C28.2@5.613,18.339 6.129,18.339 6.248,18.22 6.248,15.596 6.132,15.479 U5.61@6.132,12.452
XOUT32: C26.2 U5.31 X1.2 | length 5.3
  Top Layer w0.203: X1.2@10.713,-0.381 11.513,-0.381 12.142,0.248 12.142,1.586 11.632,2.096 U5.31@11.632,3.652
pads on no net: J2.3 J2.4 J4.A2 J4.A3 J4.A8 J4.A10 J4.A11 J4.B2 J4.B3 J4.B8 J4.B10 J4.B11 U1.4 U1.5 U1.7 U5.26 U5.37 U6.4 U6.5 U6.6 U6.7 U6.13 U6.14 U6.15 U6.26 U6.27 U6.28 U7.1 U7.10 U7.11

## Polygon pours and split planes (outlines as drawn)
GND on Bottom Layer "Polygon_2" (solid, remove dead copper, pour order 0): 0.229,26.683 -0.083,26.372 -1.219,25.044 -1.473,24.663 -1.598,24.476 -2.003,23.78 -2.616,22.682 -3.164,21.58 -3.81,19.939 -4.14,18.948 -4.452,17.698 -4.798,15.548 -4.877,14.834 -4.877,12.573 -4.75,10.744 -4.663,10.175 -4.115,7.823 -3.852,6.934 -3.454,5.867 -3.099,5.029 -2.616,3.988 -1.727,2.565 -0.61,1.016 0.864,-0.635 1.753,-1.473 2.853,-2.424 4.572,-3.607 6.477,-4.648 8.179,-5.385 9.754,-5.867 11.704,-6.294 13.919,-6.543 16.078,-6.553 17.755,-6.401 20.168,-5.918 21.946,-5.359 23.947,-4.475 26.289,-3.175 27.965,-1.829 29.312,-0.559 30.505,0.787 31.89,2.828 33.369,5.49 34.087,7.417 34.481,8.878 34.976,10.973 34.997,13.386 35.112,14.92 34.696,16.942 34.315,18.72 33.921,19.851 32.962,22.301 31.623,24.74 30.632,25.933 30.027,26.481
GND on Top Layer "Polygon_1" (solid, remove dead copper, pour order 1): 0.23,26.684 -0.206,26.248 -1.343,24.921 -1.597,24.54 -1.722,24.352 -2.127,23.656 -2.74,22.558 -3.288,21.456 -3.934,19.815 -4.264,18.825 -4.576,17.574 -4.922,15.424 -5.001,14.71 -5.001,12.449 -4.874,10.62 -4.787,10.051 -4.239,7.699 -3.976,6.811 -3.578,5.744 -3.223,4.905 -2.74,3.864 -1.851,2.442 -0.733,0.892 0.74,-0.759 1.629,-1.597 2.729,-2.548 4.448,-3.731 6.353,-4.772 8.055,-5.509 9.63,-5.991 11.58,-6.418 13.795,-6.667 15.954,-6.677 17.631,-6.525 20.044,-6.042 21.822,-5.483 23.823,-4.599 26.165,-3.299 27.842,-1.953 29.188,-0.683 30.382,0.664 31.766,2.704 33.245,5.366 33.963,7.293 34.357,8.754 34.852,10.849 34.873,13.262 34.989,14.796 34.573,16.818 34.192,18.596 33.797,19.727 32.838,22.177 31.499,24.616 30.509,25.81 29.763,26.484

## Other copper
Top Layer:
  region net GND: 16.637,22.835 16.002,22.835 16.002,15.951 16.637,15.951
  rectangle net ANT#: 10.008,25.044 11.1,27.33
  rectangle net GND: 4.496,20.828 5.207,21.158
  rectangle net GND: 16.561,21.006 16.815,21.971
  region net GND: -5.366,4.924 -0.61,6.655 -1.019,7.779 -5.775,6.048
  region net WKUP: -5.863,6.208 -1.107,7.939 -1.414,8.783 -6.171,7.052
  region net NRST: -4.416,2.708 0.09,5.104 -0.381,5.989 -4.886,3.593
  region net GND: -3.754,1.466 0.699,3.834 0.229,4.719 -4.224,2.351
  rectangle net GND: 28.575,7.366 32.71,8.306
  rectangle net VCC_3V3: 35.23,18.339 36.551,19.329
  rectangle net VCC_2V8: 35.23,15.875 37.008,16.612
  rectangle net GND: 33.325,7.442 36.551,8.661
  rectangle net GND: -6.706,16.822 -5.588,17.559
  rectangle net GND: -6.706,9.322 -5.436,10.058
  rectangle net GND: -4.242,15.9 -3.378,17.12
  rectangle net NetJ1_1: 3.048,25.959 5.105,27.102
  rectangle net GND: 0,17.501 2.845,18.923
  rectangle net GND: 2.819,19.406 5.207,20.879
  rectangle net GND: -0.914,20.879 1.93,22.327
  rectangle net GND: 1.245,23.343 5.867,25.73
  rectangle net VCC_3V3: 33.934,21.387 35.484,22.352
  rectangle net GND: 24.968,15.977 26.721,17.856
  rectangle net GND: 22.708,16.358 23.47,17.145
  rectangle net VBAT##: 23.647,16.993 24.714,17.551
  rectangle net VCC_3V3: 17.424,3.124 19.075,3.759
  rectangle net VBAT#: 16.84,16.205 17.882,18.034
  rectangle net VBAT#: 17.399,15.037 18.39,18.034
  rectangle net VCC_3V3: 17.424,3.734 17.729,5.334
  rectangle net VCC_3V3: 17.526,3.734 19.075,4.115
  region net GND: 29.972,-2.769 31.705,-1.555 28.798,2.598 27.064,1.384
  region net GND: 24.921,-6.309 31.52,-1.689 31.008,-0.958 24.409,-5.579
  region net GND: 23.582,-7.257 25.315,-6.043 22.408,-1.891 20.674,-3.105
  rectangle net GND: 20.853,19.329 25.273,19.863
  rectangle net GND: 16.612,5.791 17.221,6.291
  rectangle net RS1: 21.184,2.362 23.495,7.417
  rectangle net VBAT: 19.456,13.919 20.625,17.094
  rectangle net VUSB: 20.803,13.919 21.438,14.732
  rectangle net VBAT: 19.456,16.485 22.454,17.12
  rectangle net \C\H\G\O\K\: 24.689,10.897 25.095,12.243
  rectangle net GND: 22.708,15.977 26.721,16.789
  rectangle net GND: 24.155,18.796 25.273,20.193
  rectangle net ERASE: 8.966,12.065 9.322,12.819
  rectangle net GND: -6.655,17.043 0.813,17.882
  rectangle net VCC_3V3: 6.528,18.085 7.747,19.152
  rectangle net GND: 13.106,15.113 14.63,15.85
  rectangle net VCC_3V3: 17.78,23.851 19.177,25.806
  rectangle net VCC: 25.806,7.798 28.296,8.712
  rectangle net VCC: 25.806,8.103 28.296,8.992
  rectangle net VBAT: 25.806,11.786 27.724,12.522
  rectangle net NetC44_1: 18.72,18.237 20.574,18.999
  rectangle net NetC44_1: 18.72,14.148 19.279,18.999
  rectangle net VBAT##: 21.692,17.348 24.714,18.212
  rectangle net GND: 3.251,15.951 5.944,17.272
  rectangle net VCC_3V3: 11.938,18.059 12.7,19.152
  rectangle net SWDCLK: 11.405,22.86 12.725,23.571
  rectangle net NetR23_2: 21.615,20.168 23.978,21.387
  rectangle net VCC_3V3: 21.996,21.565 23.978,22.301
  rectangle net VCC_3V3: 18.72,22.936 21.387,25.806
  rectangle net VCC_3V3: 23.317,21.565 23.978,24.917
  rectangle net VCC_3V3: 20.853,24.74 23.978,25.806
  rectangle net NetR26_1: 15.519,23.038 16.789,23.698
  rectangle net VBAT#: 16.993,19.329 17.78,21.692
  rectangle net GND: 18.059,21.92 18.542,23.622
  rectangle net GND: 18.009,19.329 21.438,21.996
  rectangle net GND: 16.612,21.92 21.463,22.733
  rectangle net GND: 9.093,-2.057 14.834,-1.524
  region net XIN32: 14.834,0.533 12.7,0.533 12.7,-1.27 14.834,-1.27
  rectangle net XOUT32: 9.093,-1.27 11.227,0.533
  rectangle net NetR22_2: 22.022,22.53 23.038,24.486
  rectangle net GND: -0.025,17.221 0.813,17.856
  rectangle net GND: 5.283,15.951 5.969,17.704
  rectangle net GND: 18.034,4.775 18.665,5.334
  rectangle net GND: 31.598,5.436 35.408,8.661
  rectangle net GND: 31.267,19.05 34.722,21.082
  rectangle net VDD_1V2: 0.762,14.326 2.743,15.57
  rectangle net GND: -6.706,9.119 -6.172,17.882
  rectangle net GND: 28.575,7.391 29.261,9.906
  rectangle net PWR_RST: 25.603,18.059 26.67,20.218
  rectangle net GND: 30.404,18.44 34.696,21.031
  rectangle net TDO: 12.04,12.167 13.665,12.802
  region net NetLED3_1: 23.439,14.732 21.763,14.732 21.763,13.919 23.439,13.919
  rectangle net NetLED2_1: 23.978,13.919 25.654,14.732
Bottom Layer:
  rectangle net ANT#: 10.084,25.933 12.141,27.203
  rectangle net GND: 5.029,20.752 5.74,23.901
  rectangle net VDD_1V2: 0.737,14.351 2.515,15.189
  rectangle net NetR6_2: 12.192,11.176 14.351,11.862
  region net WKUP: -4.295,7.632 -5.791,6.934 -5.585,6.492 -4.089,7.19
  region net VCC_3V3: -3.271,5.862 -3.756,6.902 -4.571,6.522 -4.086,5.482
  region net GND: -4.5,5.933 -4.741,6.45 -5.46,6.115 -5.219,5.598
  region net GND: -4.745,6.445 -5.956,5.88 -5.254,4.374 -4.042,4.939
  region net VCC_3V3: -3.437,6.204 -4.227,5.836 -3.87,5.072 -3.081,5.44
  rectangle net NetL4_1: 4.801,19.152 6.172,19.863
  rectangle net GND: 7.264,19.126 11.709,21.971
  rectangle net VCC_3V3: 18.542,22.581 19.558,24.308
  rectangle net VCC_3V3: 11.913,17.983 12.548,19.558
  rectangle net VBAT: 23.495,1.524 24.79,4.724
  rectangle net AVDD: 2.692,19.507 4.597,21.666
  rectangle net GND: 10.795,9.982 11.506,12.04
  rectangle net GND: 19.761,3.15 20.041,7.544
  rectangle net GND: 7.112,4.089 8.966,10.973
  rectangle net VDD_1V2: 6.121,3.2 6.858,7.899
  rectangle net VDD_1V2: 6.121,3.2 10.566,3.886
  rectangle net GND: 18.415,3.15 20.041,5.004
  rectangle net VCC_3V3: 15.164,22.25 19.558,22.86
  rectangle net GND: 20.777,-4.191 24.181,-1.854
  rectangle net GND: 20.777,-2.337 25.832,-1.524
  rectangle net GND: 19.177,-7.62 21.793,-5.969
  rectangle net GND: 19.177,-6.833 24.028,-4.953
  rectangle net VBAT: 21.107,19.71 32.639,20.32
  rectangle net GND: 24.105,18.44 31.598,19.507
  rectangle net RS1: 21.793,1.524 22.809,2.997
  rectangle net VBAT#: 17.069,16.281 17.729,20.523
  rectangle net GND: 24.105,17.247 25.883,19.507
  rectangle net VCC_3V3: 6.35,17.983 7.087,22.936
  rectangle net NetR6_2: 12.167,11.176 13.005,12.471
  rectangle net VBAT: 21.107,16.626 21.946,20.32
  rectangle net GND: 18.237,19.38 20.676,20.498
  rectangle net GND: 19.329,16.916 20.752,20.498
  rectangle net VCC_3V3: 9.119,-8.026 14.681,-7.239
  rectangle net VCC_3V3: 11.735,9.5 14.326,10.947
  rectangle net NetSB1_1: 12.395,6.833 13.284,8.052
  rectangle net GND: -0.254,13.005 1.473,13.868
  rectangle net NetR26_1: 15.545,23.063 16.84,23.698
  rectangle net VCC_3V3: 6.629,22.377 8.077,22.936
  rectangle net BST: 24.028,7.874 24.74,9.093
  rectangle net VCC_3V3: 17.378,3.15 18.237,5.258
  rectangle net NetR9_1: 17.907,18.161 18.999,19.152
  region net VCC_3V3: 12.548,18.898 10.947,18.898 10.947,17.983 12.548,17.983
  rectangle net GND: 0,17.628 2.769,18.872
  rectangle net AVDD: 0.914,19.075 4.597,19.888
  rectangle net VCC_3V3: 6.629,17.983 8.001,18.898
  rectangle net GND: 22.098,22.479 24.46,26.314
  rectangle net VCC_3V3: 23.038,20.625 23.851,22.2
  rectangle net NetR23_2: 21.565,20.599 22.708,21.412
  rectangle net VCC_3V3: 21.996,21.615 23.851,22.276
  rectangle net NetR23_2: 22.149,20.599 22.708,21.311
  rectangle net VCC_2V8: 24.943,20.625 26.391,24.206
  region net NRST: -3.826,2.719 -1.625,3.746 -2.356,5.314 -4.558,4.288
  rectangle net GND: 24.028,9.449 25.324,11.151
  rectangle net NTC: 22.454,10.414 23.851,12.167
  rectangle net VCC_3V3: 16.662,5.207 19.482,5.944
  rectangle net VCC_3V3: 5.486,11.176 9.83,11.913
  rectangle net VCC_3V3: 5.486,8.128 6.858,11.887

## Silkscreen, mask and mechanical layers (free items; w line width, h text height)
Top Overlay:
  circle w0.2: c2.87,26.543 r0.08
  lines w0.254: 18.013,13.056 18.694,13.056 18.974,13.335 18.974,14.021
  text "IND: LED" at 26.543,21.793 h1.52
  text "SENSOR BOARD" at -0.508,10.788 h1.52 r90
  text "BOARD EDGE" at 34.747,9.779 h0.76 r90
  text "+VE" at 31.805,2.72 h1.27 r57.5
  text "-VE" at 30.625,0.896 h1.27 r57.5
Bottom Overlay:
  drawing of 2568 lines, arcs and shapes, not listed
  text "+VE" at 34.099,3.325 h1.52 r57.5
  text "-VE" at 31.381,-1.095 h1.52 r57.5
Mechanical 2:
  circle w0.254: c15.037,13.36 r22.5
Drill Drawing:
  drawing of 473 lines, arcs and shapes, not listed
  text "Layer" at -132.728,97.823 h1.52
  text "Name" at -122.316,97.823 h1.52
  text "Material" at -98.7,97.823 h1.52
  text "Thickness" at -76.862,97.823 h1.52
  text "Constant" at -60.356,97.823 h1.52
  text "Board Layer Stack" at -45.882,97.823 h1.52
  text "Top Overlay" at -122.316,94.775 h1.52
  text "Top Solder" at -122.316,91.727 h1.52
  text "Solder Resist" at -98.7,91.727 h1.52
  text "3.00mil" at -76.862,91.727 h1.52
  text "3.5" at -60.356,91.727 h1.52
  text "1" at -132.728,88.679 h1.52
  text "Top Layer" at -122.316,88.679 h1.52
  text "9.00mil" at -76.862,88.679 h1.52
  text "Dielectric 1" at -122.316,85.631 h1.52
  text "FR-4" at -98.7,85.631 h1.52
  text "16.00mil" at -76.862,85.631 h1.52
  text "4.6" at -60.356,85.631 h1.52
  text "2" at -132.728,82.583 h1.52
  text "Bottom Layer" at -122.316,82.583 h1.52
  text "9.00mil" at -76.862,82.583 h1.52
  text "Bottom Solder" at -122.316,79.535 h1.52
  text "Solder Resist" at -98.7,79.535 h1.52
  text "3.00mil" at -76.862,79.535 h1.52
  text "3.5" at -60.356,79.535 h1.52
  text "Bottom Overlay" at -122.316,76.487 h1.52
  text "Symbol" at 71.92,52.958 h1.83
  text "Count" at 84.769,52.958 h1.83
  text "Hole Size" at 99.751,52.958 h1.83
  text "Plated" at 127.683,52.958 h1.83
  text "Hole Type" at 140.533,52.958 h1.83
  text "Drill Layer Pair" at 159.171,52.958 h1.83
  text "Via/Pad" at 197.26,52.958 h1.83
  text "Pad Shape" at 212.242,52.958 h1.83
  text "Template" at 231.185,52.958 h1.83
  text "Description" at 260.387,52.958 h1.83
  text "Hole Tolerance (+)" at 282.072,52.958 h1.83
  text "Hole Tolerance (-)" at 315.946,52.958 h1.83
  text "Hole Length" at 349.819,52.958 h1.83
  text "Routed Path Length" at 377.497,52.958 h1.83
  text "1" at 84.769,49.148 h1.52
  text "2.000mm (78.74mil)" at 99.751,49.148 h1.52
  text "PTH" at 127.683,49.148 h1.52
  text "Round" at 140.533,49.148 h1.52
  text "Top Layer - Bottom Layer" at 159.171,49.148 h1.52
  text "Pad" at 197.26,49.148 h1.52
  text "Rounded" at 212.242,49.148 h1.52
  text "c400h200" at 231.185,49.148 h1.52
  text "-" at 349.819,49.148 h1.52
  text "-" at 377.497,49.148 h1.52
  text "1" at 84.769,45.338 h1.52
  text "2.500mm (98.43mil)" at 99.751,45.338 h1.52
  text "PTH" at 127.683,45.338 h1.52
  text "Round" at 140.533,45.338 h1.52
  text "Top Layer - Bottom Layer" at 159.171,45.338 h1.52
  text "Pad" at 197.26,45.338 h1.52
  text "Rounded" at 212.242,45.338 h1.52
  text "c400h250" at 231.185,45.338 h1.52
  text "-" at 349.819,45.338 h1.52
  text "-" at 377.497,45.338 h1.52
  text "2" at 84.769,41.528 h1.52
  text "0.450mm (17.72mil)" at 99.751,41.528 h1.52
  text "PTH" at 127.683,41.528 h1.52
  text "Slot" at 140.533,41.528 h1.52
  text "Top Layer - Bottom Layer" at 159.171,41.528 h1.52
  text "Pad" at 197.26,41.528 h1.52
  text "Rounded" at 212.242,41.528 h1.52
  text "r85_185h45_145r100" at 231.185,41.528 h1.52
  text "1.450mm (57.09mil)" at 349.819,41.528 h1.52
  text "1.000mm (39.37mil)" at 377.497,41.528 h1.52
  text "2" at 84.769,37.718 h1.52
  text "0.450mm (17.72mil)" at 99.751,37.718 h1.52
  text "PTH" at 127.683,37.718 h1.52
  text "Slot" at 140.533,37.718 h1.52
  text "Top Layer - Bottom Layer" at 159.171,37.718 h1.52
  text "Pad" at 197.26,37.718 h1.52
  text "Rounded" at 212.242,37.718 h1.52
  text "r85_205h45_165r100" at 231.185,37.718 h1.52
  text "1.650mm (64.96mil)" at 349.819,37.718 h1.52
  text "1.200mm (47.25mil)" at 377.497,37.718 h1.52
  text "2" at 84.769,33.908 h1.52
  text "0.700mm (27.56mil)" at 99.751,33.908 h1.52
  text "PTH" at 127.683,33.908 h1.52
  text "Round" at 140.533,33.908 h1.52
  text "Top Layer - Bottom Layer" at 159.171,33.908 h1.52
  text "Pad" at 197.26,33.908 h1.52
  text "(Mixed)" at 212.242,33.908 h1.52
  text "(Mixed)" at 231.185,33.908 h1.52
  text "-" at 349.819,33.908 h1.52
  text "-" at 377.497,33.908 h1.52
  text "12" at 84.769,30.098 h1.52
  text "0.950mm (37.40mil)" at 99.751,30.098 h1.52
  text "PTH" at 127.683,30.098 h1.52
  text "Round" at 140.533,30.098 h1.52
  text "Top Layer - Bottom Layer" at 159.171,30.098 h1.52
  text "Pad" at 197.26,30.098 h1.52
  text "(Mixed)" at 212.242,30.098 h1.52
  text "(Mixed)" at 231.185,30.098 h1.52
  text "-" at 349.819,30.098 h1.52
  text "-" at 377.497,30.098 h1.52
  text "181" at 84.769,26.288 h1.52
  text "0.300mm (11.81mil)" at 99.751,26.288 h1.52
  text "PTH" at 127.683,26.288 h1.52
  text "Round" at 140.533,26.288 h1.52
  text "Top Layer - Bottom Layer" at 159.171,26.288 h1.52
  text "Via" at 197.26,26.288 h1.52
  text "Rounded" at 212.242,26.288 h1.52
  text "(Mixed)" at 231.185,26.288 h1.52
  text "-" at 349.819,26.288 h1.52
  text "-" at 377.497,26.288 h1.52
  text "201 Total" at 84.769,22.478 h1.52
  text "Slot definitions :" at 71.92,18.795 h1.52
  text "Routed Path Length" at 98.15,18.795 h1.52
  text "= Calculated from tool start centre position to tool end centre position." at 126.158,18.795 h1.52
  text "Hole Length" at 98.15,16.256 h1.52
  text "= Routed Path Length + Tool Size = Slot length as defined in the PCB layout" at 115.748,16.256 h1.52